# Altium PCB VCO_RAW_Front.PcbDoc
Units mm, origin at the board's own origin, x right, y up, seen from the top; angles counter-clockwise.
Board outline 30 x 128.5 mm, 2 copper layers (Top Layer, Bottom Layer); 3 components, 0 nets, 48 pads, 0 vias.
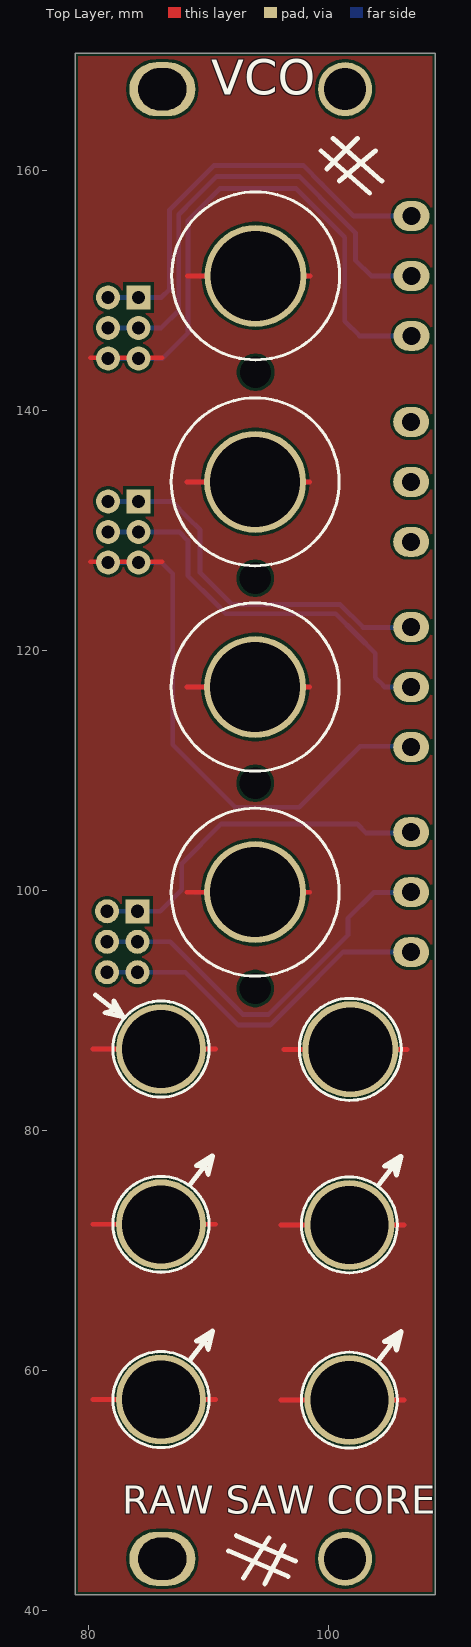
[diagram p0: Top Layer view]
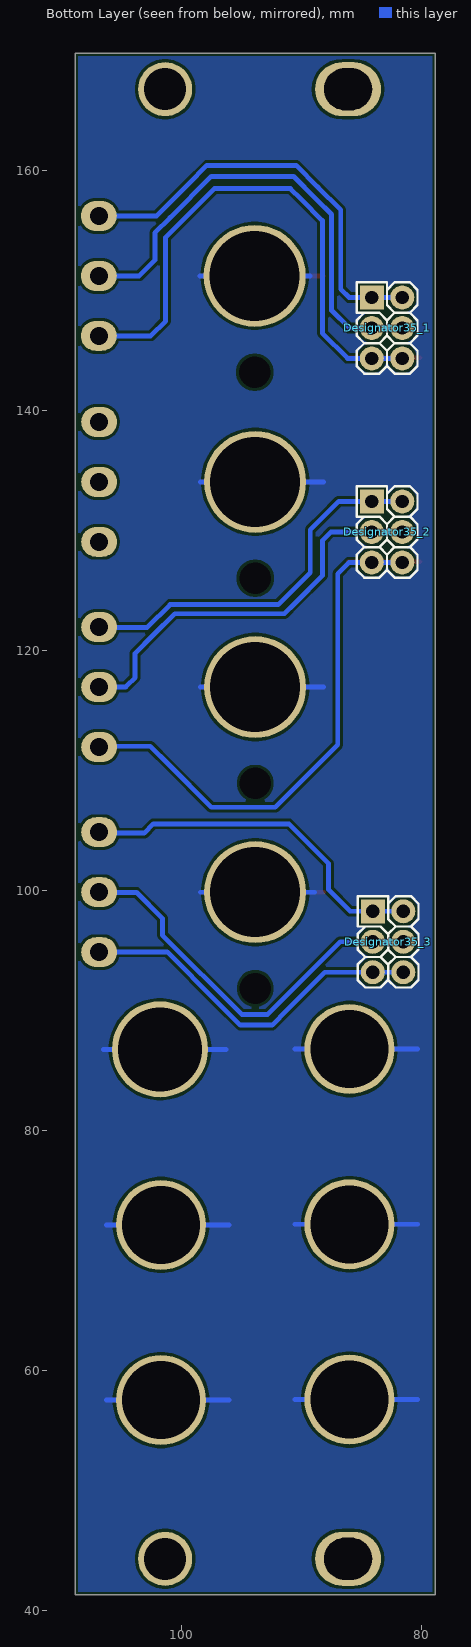
[diagram p1: Bottom Layer view, seen from below]

## Layer stack, top to bottom
Top Solder: solder mask 0.0102, Solder Resist, Dk 3.5
Top Layer: signal copper 0.0356
Dielectric 1: dielectric 0.32, FR-4, Dk 4.8
Bottom Layer: signal copper 0.0356
Bottom Solder: solder mask 0.0102, Solder Resist, Dk 3.5

## Board outline
78.873,41.281 78.873,169.781 108.873,169.781 108.873,41.281

## Design rules (kind name [scope] priority, off if disabled: settings)
BoardOutlineClearance [All] p1: gap=0.254 ignorepadtopadclearanceinfootprint=FALSE except(0: Arc-SplitContinuation Track-SplitContinuation SMDPad-SplitContinuation THPad-SplitContinuation Via-SplitContinuation Fill-SplitContinuation Poly-SplitContinuation Region-SplitContinuation Text-SplitContinuation)
Clearance [All] p1: gap=0.254 ignorepadtopadclearanceinfootprint=FALSE
PolygonConnect [All] p1: connectstyle=Relief reliefconductorwidth=0.254 reliefentries=4 polygonreliefangle="90 Angle" airgapwidth=0.254
RoutingVias [All] p1: holewidth=0.711 width=1.27 viastyle="Through Hole" minholewidth=0.711 minwidth=1.27 maxholewidth=0.711 maxwidth=1.27
SolderMaskExpansion [All] p1: expansion=0.102 istentingtop=FALSE
Width [All] p1: maxlimit=0.4 minlimit=0.254 preferedwidth=0.254
30 further rules are at their usual default settings.

## Components (designator, comment, footprint, x,y, rotation, side; value= is the part's Value field where it differs from the comment)
Designator35_1 "Comment" "CON: PLD-6" 82.88,146.88 r270 bottom
Designator35_2 "Comment" "CON: PLD-6" 82.88,129.88 r270 bottom
Designator35_3 "Comment" "CON: PLD-6" 82.794,95.714 r270 bottom

## Footprints (in the part's own frame and the unit in brackets; to place one, negate y for a bottom-side part, rotate by r counter-clockwise, add the part's x,y. Pads: shape width x height; smd on the part's side, far side on the other; paste and mask are expansions set on the pad)
"CON: PLD-6" [mm]
  rect 2x2 hole 1.1: 1(-2.54,-1.27)
  round 2 hole 1.1: 2(-2.54,1.27) 3(0,-1.27) 4(0,1.27) 5(2.54,-1.27) 6(2.54,1.27)
  silkscreen extent -3.81,-2.54 3.81,2.54, body extent -3.81,-2.54 3.81,2.54, height 8.54

## Free pads (board coordinates)
  oval 3x2.5 hole 1.5: 2(106.873,94.849) 2(106.873,99.849) 2(106.873,104.849) 2(106.873,111.949) 2(106.873,116.949) 2(106.873,121.949) 2(106.873,129.049) 2(106.873,134.049) 2(106.873,139.049) 2(106.91,146.22) 2(106.91,151.22) 2(106.91,156.22)
  round 7.5 hole 6.5: 4(86.023,57.556) 4(86.023,72.165) 4(86.023,86.774) 4(101.723,57.506) 4(101.723,72.115)
  oval 5.5x4.5 hole 3.5 slot 4 at 0 deg: 4(86.133,44.281) 4(86.133,166.781)
  round 1 hole 2.6: 4(93.873,91.822) 4(93.873,108.922) 4(93.873,126.022) 4(93.91,143.193)
  round 8.5 hole 7.5: 4(93.873,99.849) 4(93.873,116.949) 4(93.873,134.049) 4(93.91,151.22)
  round 4.5 hole 3.5: 4(101.373,44.281) 4(101.373,166.781)
  round 8 hole 7: 4(101.805,86.75)

## Nets (pads, with @x,y where several pads share a name; then routed paths per layer and width w, separated by ;. In a path a pad name is that pad's centre, name@x,y a point inside that pad or via, vN(x,y) a via of type N, cw(c..) or ccw(c..) an arc to the next point about the centre after c; other vN are vias at no path point)
pads on no net: Designator35_1.1 Designator35_1.2 Designator35_1.3 Designator35_1.4 Designator35_1.5 Designator35_1.6 Designator35_2.1 Designator35_2.2 Designator35_2.3 Designator35_2.4 Designator35_2.5 Designator35_2.6 Designator35_3.1 Designator35_3.2 Designator35_3.3 Designator35_3.4 Designator35_3.5 Designator35_3.6
copper on no net: | length 538.9
  Top Layer w0.4: 80.137,127.399 86.106,127.399 ; 80.137,144.399 86.106,144.399 ; 80.329,57.556 90.576,57.556 ; 80.329,72.165 90.576,72.165 ; 80.329,86.774 90.576,86.774 ; 88.179,99.849 98.426,99.849 ; 88.179,116.949 98.426,116.949 ; 88.179,134.049 98.426,134.049 ; 88.216,151.22 98.463,151.22 ; 96.029,57.506 106.276,57.506 ; 96.029,72.115 106.276,72.115 ; 96.286,86.741 106.534,86.741
  Bottom Layer w0.4: 80.329,57.556 90.576,57.556 ; 80.329,72.165 90.576,72.165 ; 80.329,86.774 90.576,86.774 ; 81.524,93.174 85.961,93.174 88.055,93.174 91.186,90.043 92.456,88.773 94.361,88.773 95.123,88.773 97.028,90.678 101.219,94.869 106.68,94.869 ; 81.524,95.714 85.961,95.714 86.785,95.714 89.281,93.218 92.837,89.662 94.996,89.662 101.6,96.266 101.6,97.663 103.759,99.822 106.873,99.822 ; 81.524,98.254 85.961,98.254 87.757,100.05 87.757,102.235 91.059,105.537 92.075,105.537 102.362,105.537 103.124,104.775 107.061,104.775 ; 81.61,127.34 86.047,127.34 86.995,126.393 86.995,123.825 86.995,112.141 92.202,106.934 97.536,106.934 101.092,110.49 102.616,112.014 106.873,112.014 ; 81.61,129.88 86.047,129.88 87.544,129.88 88.265,129.159 88.265,126.619 88.265,126.238 90.551,123.952 91.44,123.063 94.234,123.063 100.584,123.063 102.362,121.285 103.886,119.761 103.886,117.983 103.886,117.729 104.573,117.042 104.666,116.949 106.873,116.949 ; 81.61,132.42 86.047,132.42 86.909,132.42 88.265,131.064 89.281,130.048 89.281,126.492 91.948,123.825 94.615,123.825 100.965,123.825 102.87,121.92 106.873,121.92 ; 81.61,144.34 86.047,144.34 86.174,144.34 88.265,146.431 88.265,155.829 90.043,157.607 90.932,158.496 96.52,158.496 97.282,158.496 100.076,155.702 101.346,154.432 101.346,149.86 101.346,147.447 102.573,146.22 106.91,146.22 ; 81.61,146.88 86.047,146.88 87.503,148.336 87.503,150.749 87.503,156.337 88.773,157.607 90.678,159.512 96.901,159.512 97.536,159.512 100.965,156.083 102.235,154.813 102.235,153.289 102.235,152.527 103.542,151.22 106.91,151.22 ; 81.61,149.42 86.047,149.42 86.741,150.114 86.741,151.13 86.741,156.718 88.646,158.623 90.449,160.426 97.892,160.426 99.441,158.877 102.108,156.21 107.442,156.21 ; 88.179,116.949 98.426,116.949 ; 88.179,134.049 98.426,134.049 ; 88.9,99.849 98.426,99.849 ; 89.281,151.22 98.463,151.22 ; 96.029,57.506 106.276,57.506 ; 96.029,72.115 106.276,72.115 ; 96.286,86.741 106.534,86.741

## Polygon pours and split planes (outlines as drawn)
no net on Bottom Layer "NONET_L02_P-001" (solid, pour order 0): 78.527,169.915 78.527,40.883 109.007,40.883 109.007,169.915
no net on Top Layer "+" (solid, pour order 1): 78.527,169.915 78.527,41.391 109.007,41.391 109.007,169.915

## Silkscreen, mask and mechanical layers (free items; w line width, h text height)
Top Overlay:
  circle w0.254: c101.723,72.115 r4
  circle w0.254: c101.723,57.506 r4
  circle w0.254: c86.023,57.556 r4
  circle w0.254: c86.023,72.165 r4
  circle w0.254: c101.805,86.75 r4.25
  circle w0.254: c86.023,86.774 r4
  circle w0.254: c93.873,99.849 r7
  circle w0.254: c93.873,116.949 r7
  circle w0.254: c93.873,134.049 r7
  circle w0.254: c93.91,151.22 r7
  lines w0.4: 80.559,91.269 82.911,89.427 ; 81.87,89.96 81.356,89.797 82.911,89.427 ; 82.083,90.253 82.079,90.793 82.911,89.427 ; 88.484,60.92 90.325,63.272 ; 88.484,75.529 90.325,77.881 ; 89.5,62.444 88.96,62.44 90.325,63.272 ; 89.5,77.053 88.96,77.049 90.325,77.881 ; 89.792,62.232 89.955,61.717 90.325,63.272 ; 89.792,76.84 89.955,76.326 90.325,77.881 ; 91.641,44.938 96.605,42.812 ; 92.293,46.219 97.257,44.092 ; 92.909,42.68 95.023,46.037 ; 94.672,42.184 96.303,45.385 ; 99.355,161.66 103.419,158.104 ; 99.863,160.136 102.403,162.676 ; 100.371,162.676 104.435,159.12 ; 100.879,159.12 103.927,161.66 ; 104.184,60.87 106.026,63.222 ; 104.184,75.479 106.026,77.831 ; 105.2,62.394 104.66,62.39 106.026,63.222 ; 105.2,77.003 104.66,76.999 106.026,77.831 ; 105.493,62.181 105.656,61.667 106.026,63.222 ; 105.493,76.79 105.656,76.276 106.026,77.831
  text "VCO" at 90.213,165.343 h5
  text "RAW SAW CORE" at 82.804,47.244 h4
Top Solder:
  lines w0.4: 83.312,77.47 88.265,77.47 ; 83.82,62.861 84.963,64.77 85.979,62.865 87.122,64.774 88.138,62.869 ; 83.82,77.47 83.82,79.375 ; 85.788,77.47 85.788,79.311 ; 87.63,77.47 87.63,79.248 ; 99.06,77.42 99.52,77.42 99.52,79.325 100.38,79.325 100.584,79.325 100.584,77.534 100.648,77.47 101.854,77.47 101.854,79.375 102.714,79.375 102.918,79.375 102.918,77.647 ; 99.52,62.811 101.489,64.652 101.489,62.811 103.33,64.589 103.33,62.811 ; 102.919,77.492 103.38,77.492
  text "ƒCOARSE" at 85.65,155.495 h3 r36
  text "ƒFINE" at 85.613,138.324 h3 r36
  text "PWPW" at 85.97,120.734 h3 r36
  text "CV IN" at 85.97,103.634 h3 r36
  text "LFOv" at 102.929,91.888 h3 r324
  text "VCO^" at 97.268,89.407 h3 r36
Board Shape:
  the board outline again, w0.013
Mechanical 4:
  circle w0.013: c81.524,93.174 r0.55
  circle w0.013: c84.15,127.34 r0.55
  circle w0.013: c84.064,95.714 r0.55
  circle w0.013: c84.15,146.88 r0.55
  circle w0.013: c84.064,98.254 r0.55
  circle w0.013: c84.15,132.42 r0.55
  circle w0.013: c81.61,129.88 r0.55
  circle w0.013: c81.524,95.714 r0.55
  circle w0.013: c81.61,146.88 r0.55
  circle w0.013: c81.61,144.34 r0.55
  circle w0.013: c81.61,132.42 r0.55
  circle w0.013: c84.15,144.34 r0.55
  circle w0.013: c84.15,149.42 r0.55
  circle w0.013: c81.61,127.34 r0.55
  circle w0.013: c84.15,129.88 r0.55
  circle w0.013: c81.61,149.42 r0.55
  circle w0.013: c84.064,93.174 r0.55
  circle w0.013: c81.524,98.254 r0.55
  circle w0.013: c101.373,44.281 r1.75
  circle w0.013: c101.373,166.781 r1.75
  circle w0.013: c86.023,57.556 r3.25
  circle w0.013: c101.723,57.506 r3.25
  circle w0.013: c101.723,72.115 r3.25
  circle w0.013: c86.023,72.165 r3.25
  circle w0.013: c86.023,86.774 r3.25
  circle w0.013: c106.91,156.22 r0.75
  circle w0.013: c106.91,151.22 r0.75
  circle w0.013: c106.91,146.22 r0.75
  circle w0.013: c93.91,151.22 r3.75
  circle w0.013: c93.91,143.22 r1.5
  circle w0.013: c106.873,139.049 r0.75
  circle w0.013: c106.873,134.049 r0.75
  circle w0.013: c106.873,129.049 r0.75
  circle w0.013: c93.873,134.049 r3.75
  circle w0.013: c93.873,126.049 r1.5
  circle w0.013: c106.873,121.949 r0.75
  circle w0.013: c106.873,116.949 r0.75
  circle w0.013: c106.873,111.949 r0.75
  circle w0.013: c93.873,116.949 r3.75
  circle w0.013: c93.873,108.949 r1.5
  circle w0.013: c106.873,104.849 r0.75
  circle w0.013: c106.873,99.849 r0.75
  circle w0.013: c106.873,94.849 r0.75
  circle w0.013: c93.873,99.849 r3.75
  circle w0.013: c93.873,91.849 r1.5
  circle w0.013: c101.805,86.75 r4
  lines w0.013: 85.133,42.531 cw(c85.133,44.281) 85.133,46.031 86.133,46.031 cw(c86.133,44.281) 86.133,42.531 85.133,42.531 ; 85.133,165.031 cw(c85.133,166.781) 85.133,168.531 86.133,168.531 cw(c86.133,166.781) 86.133,165.031 85.133,165.031